# Altium PCB PCB_ARC_1.0.5.PcbDoc (part 1 of 4)
Units mil, origin at the board's own origin, x right, y up, seen from the top; angles counter-clockwise.
Board outline 3621 x 2945 mil, 2 copper layers (Top Layer, Bottom Layer), stack 62 mil thick; 201 components, 125 nets, 582 pads, 196 vias.
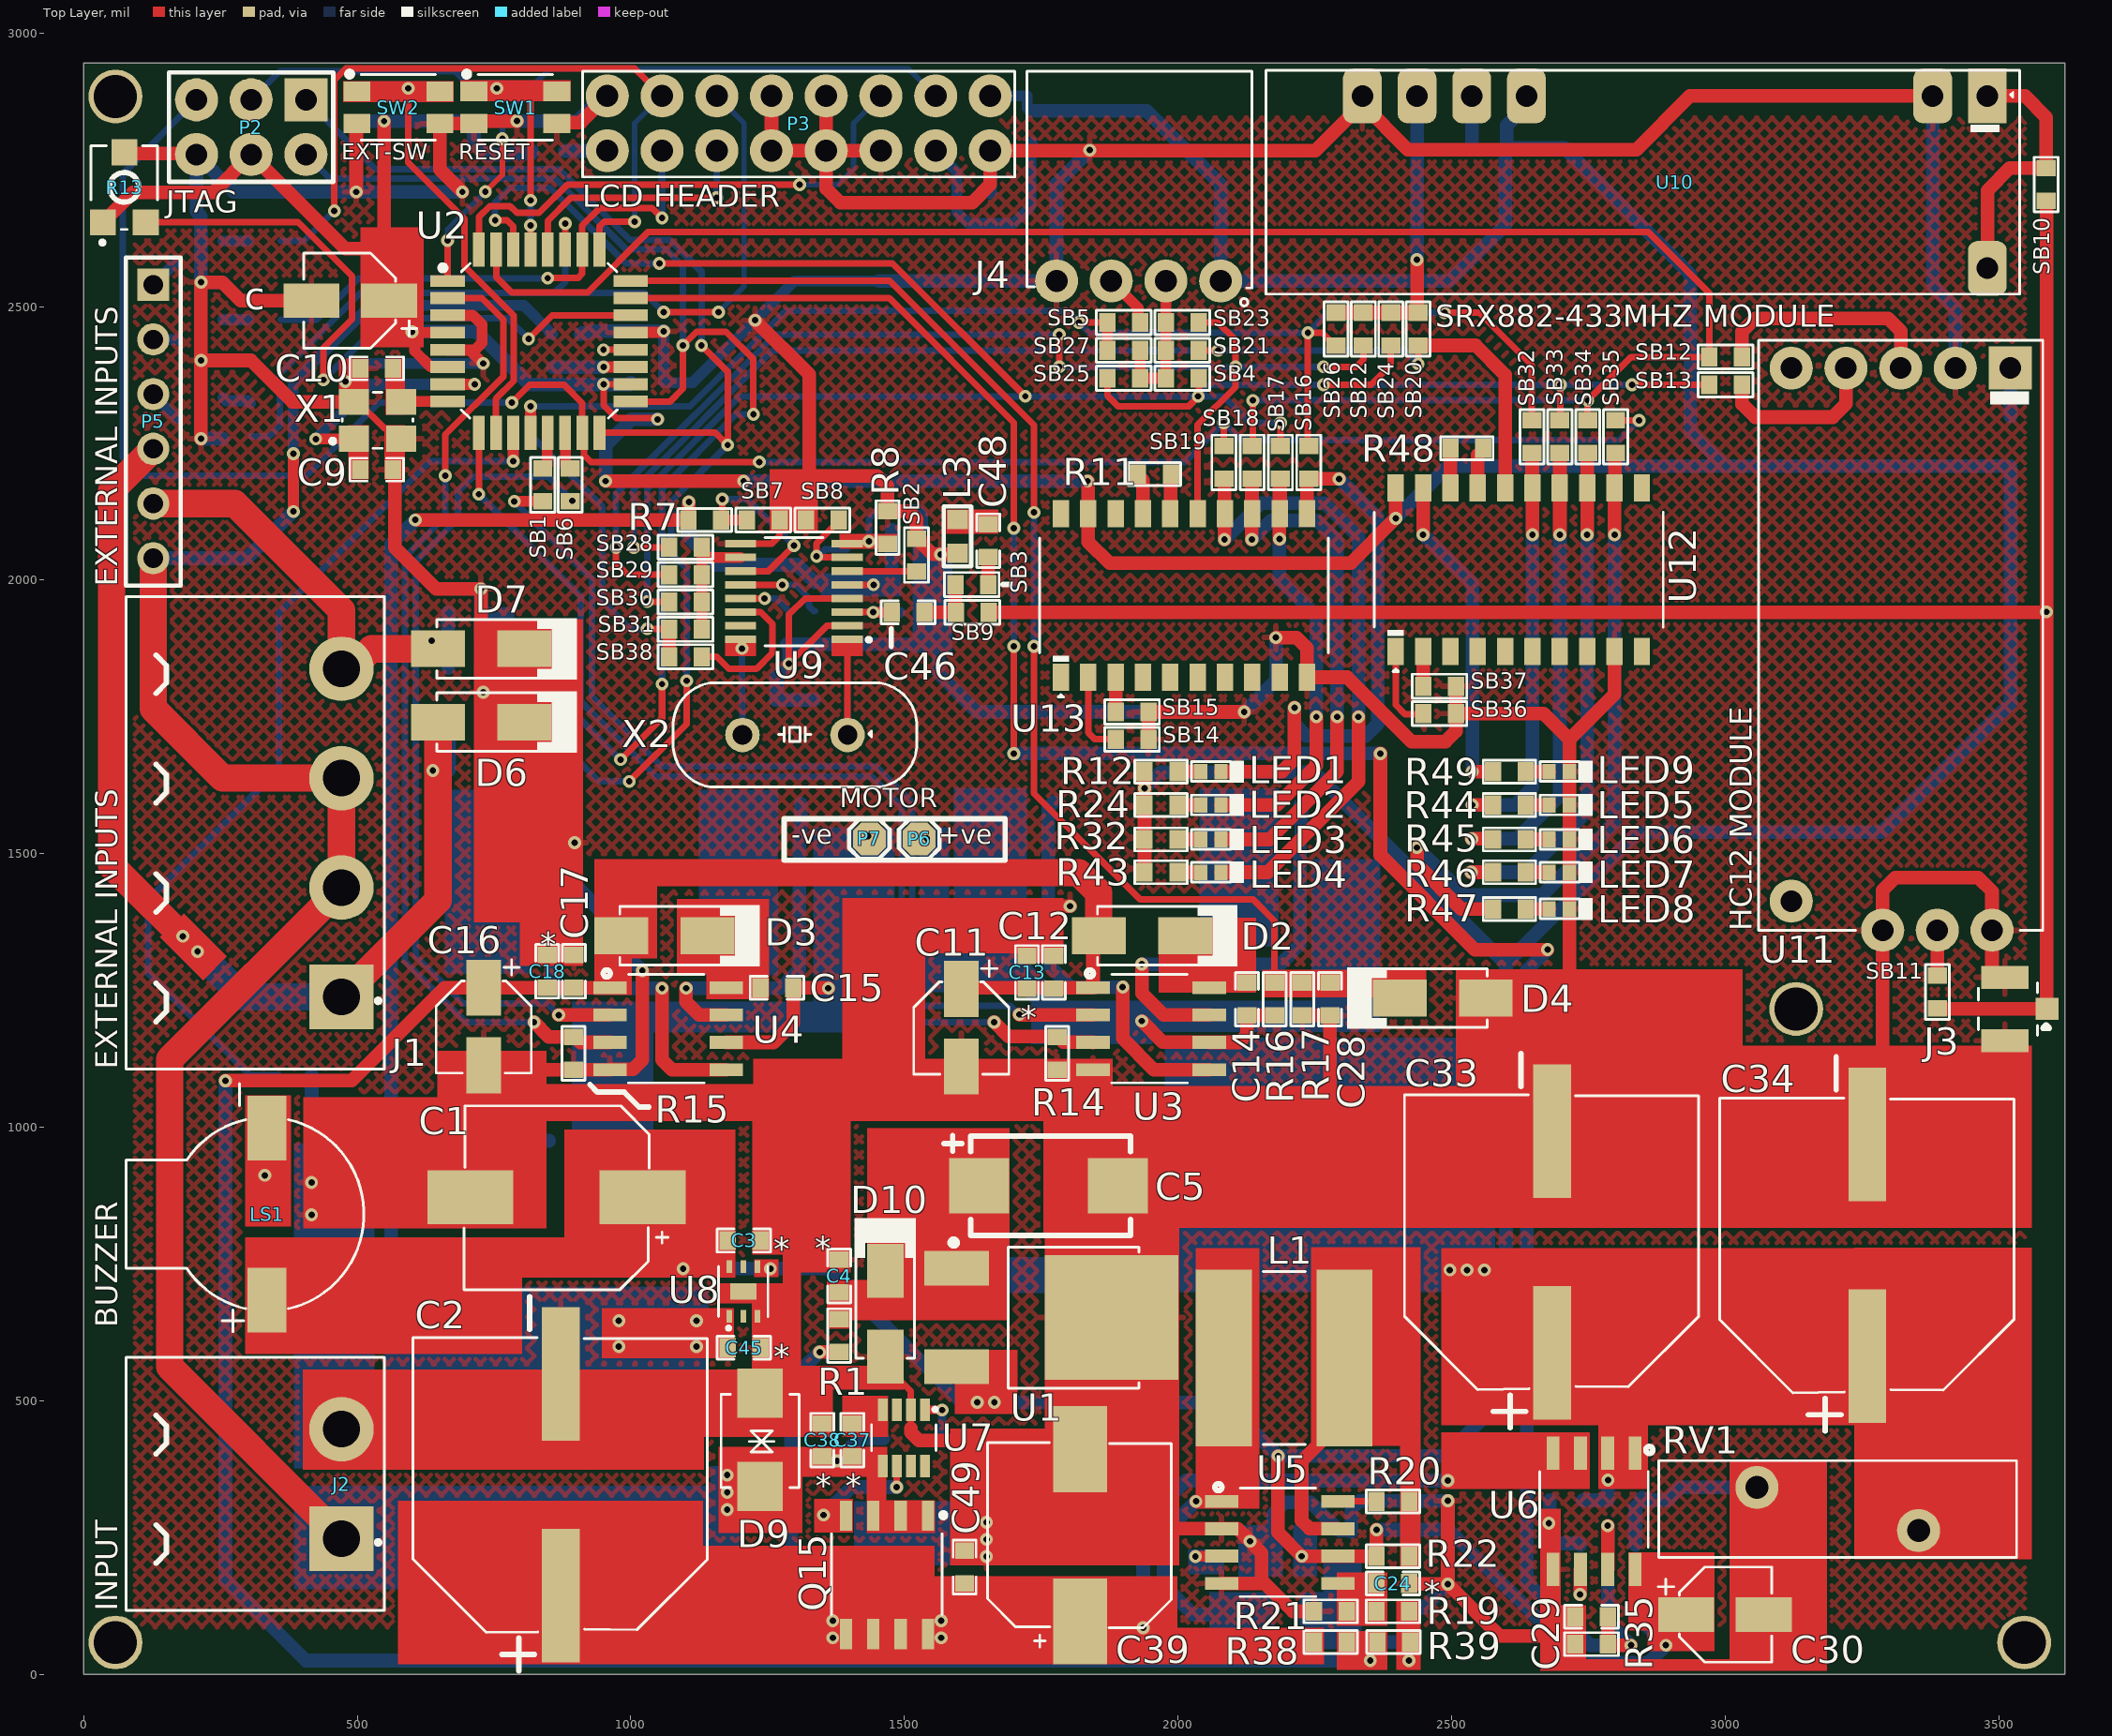
[diagram p0: Top Layer view]
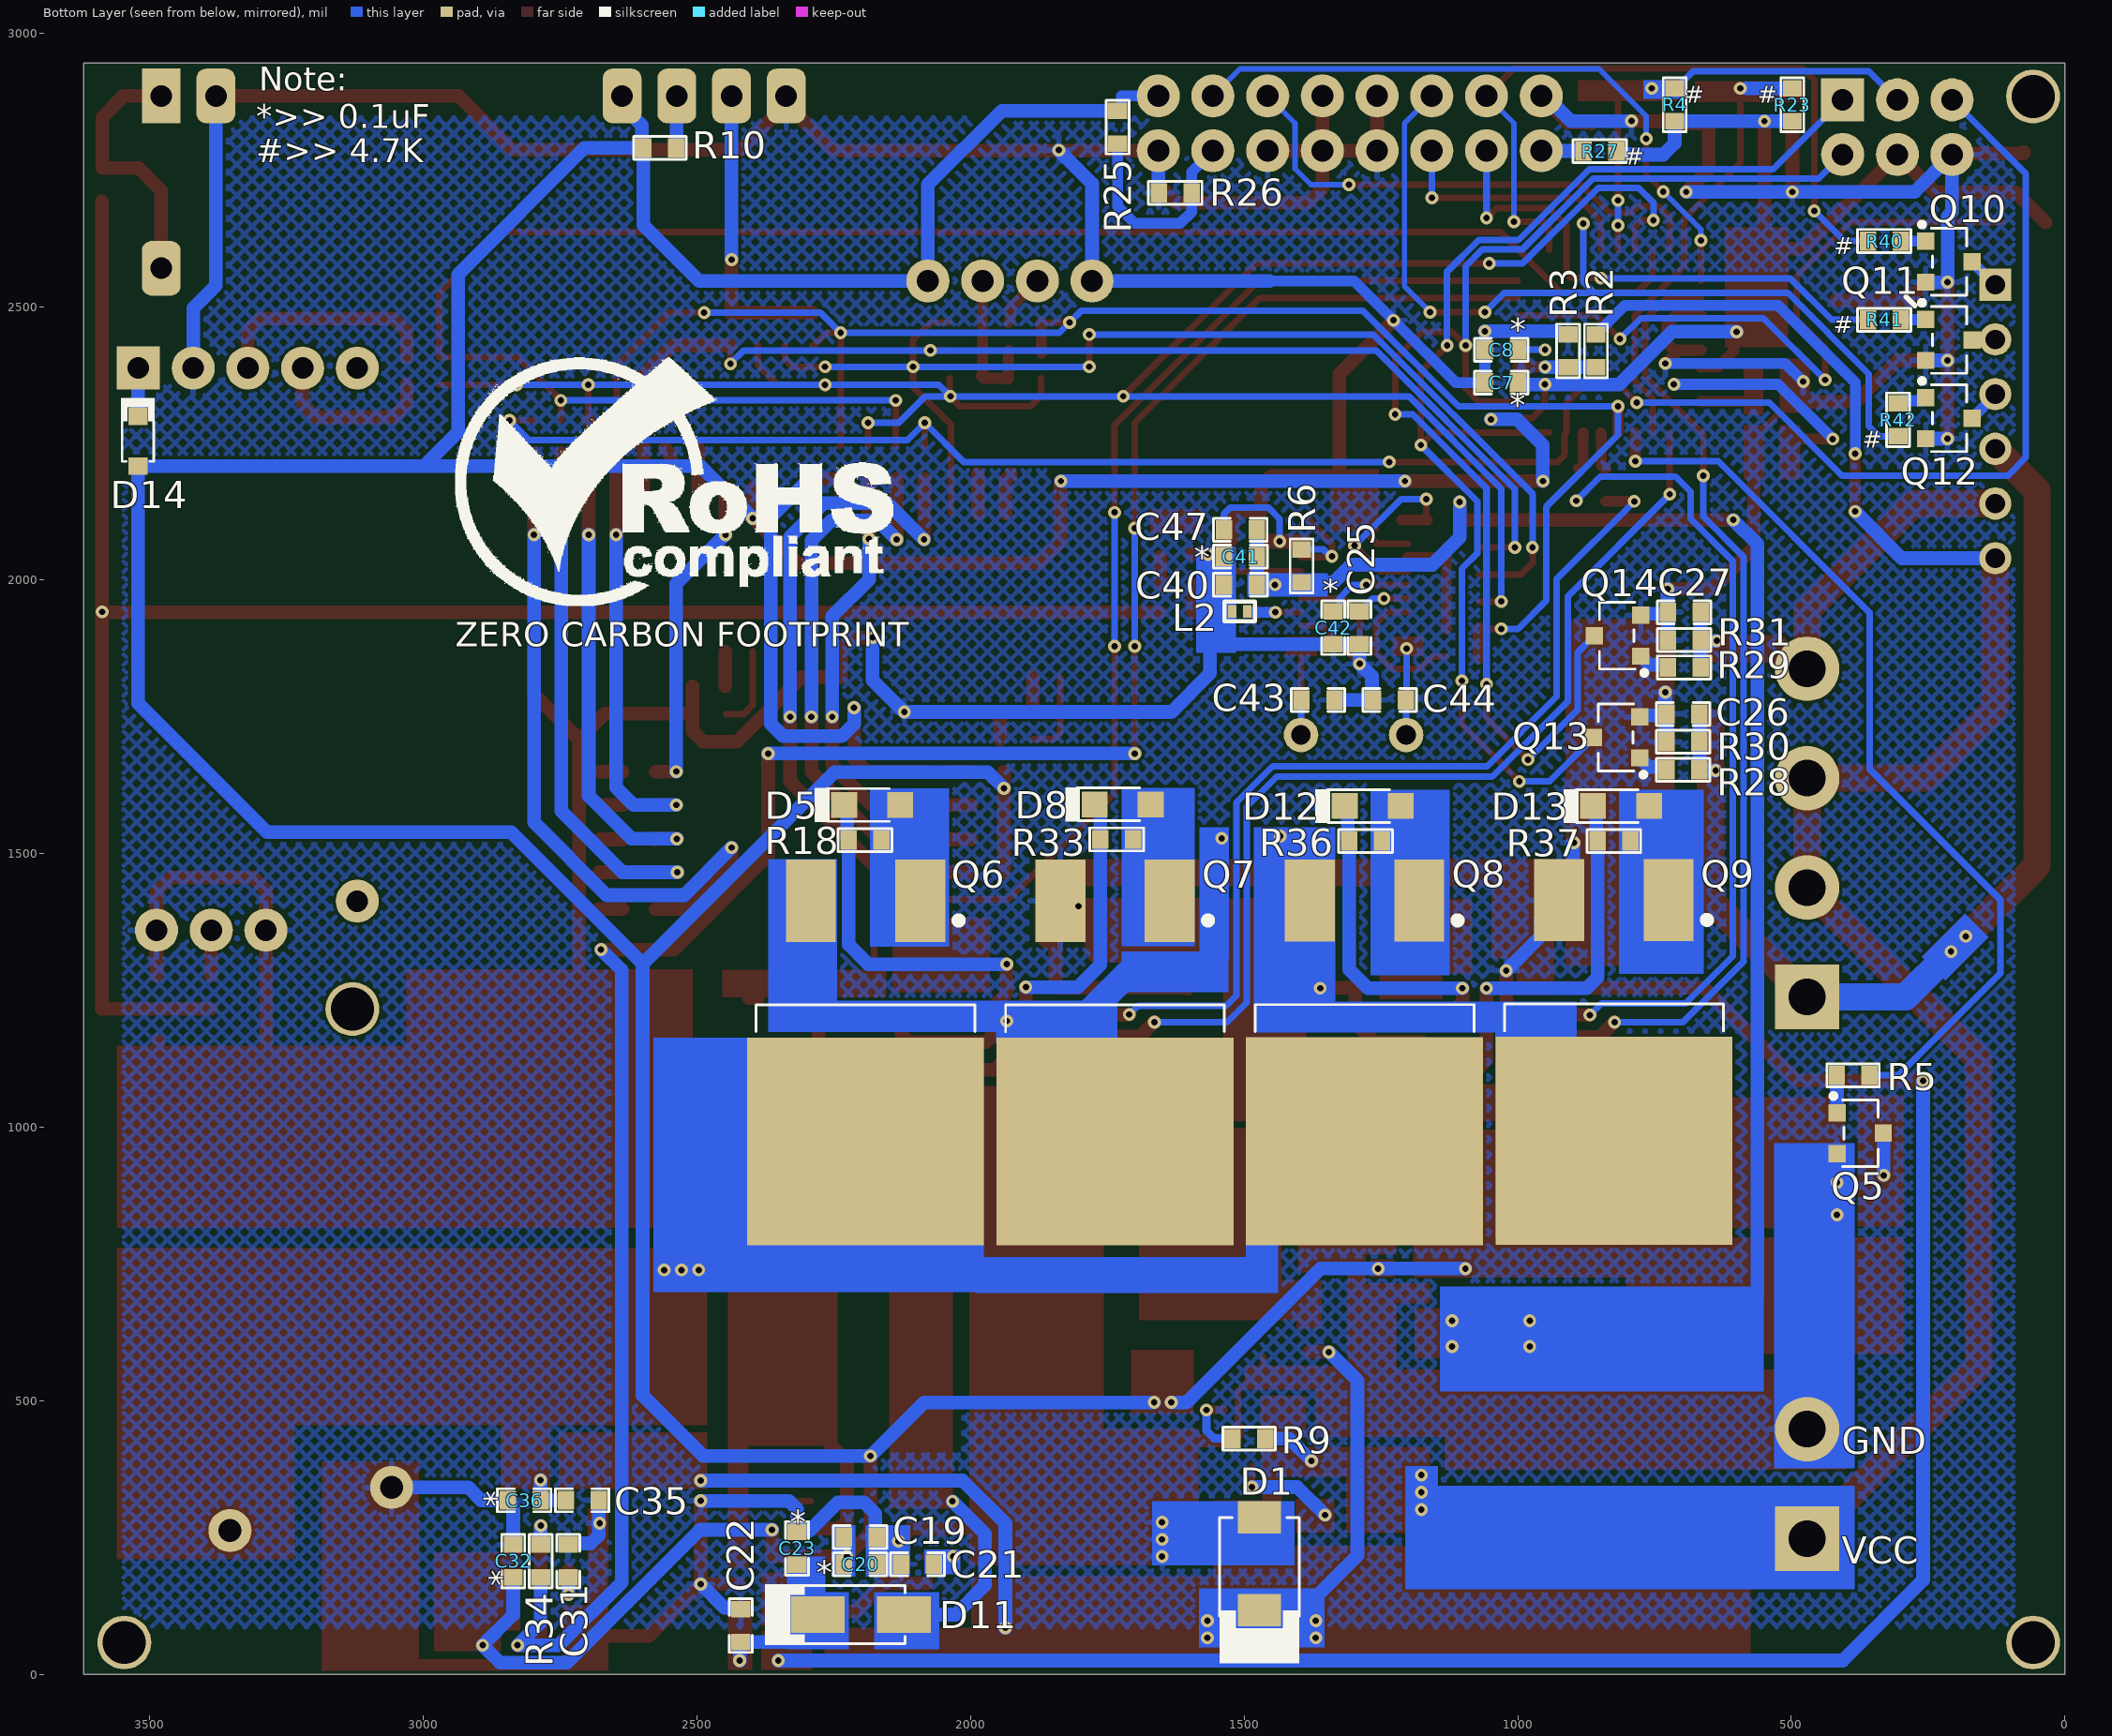
[diagram p1: Bottom Layer view, seen from below]
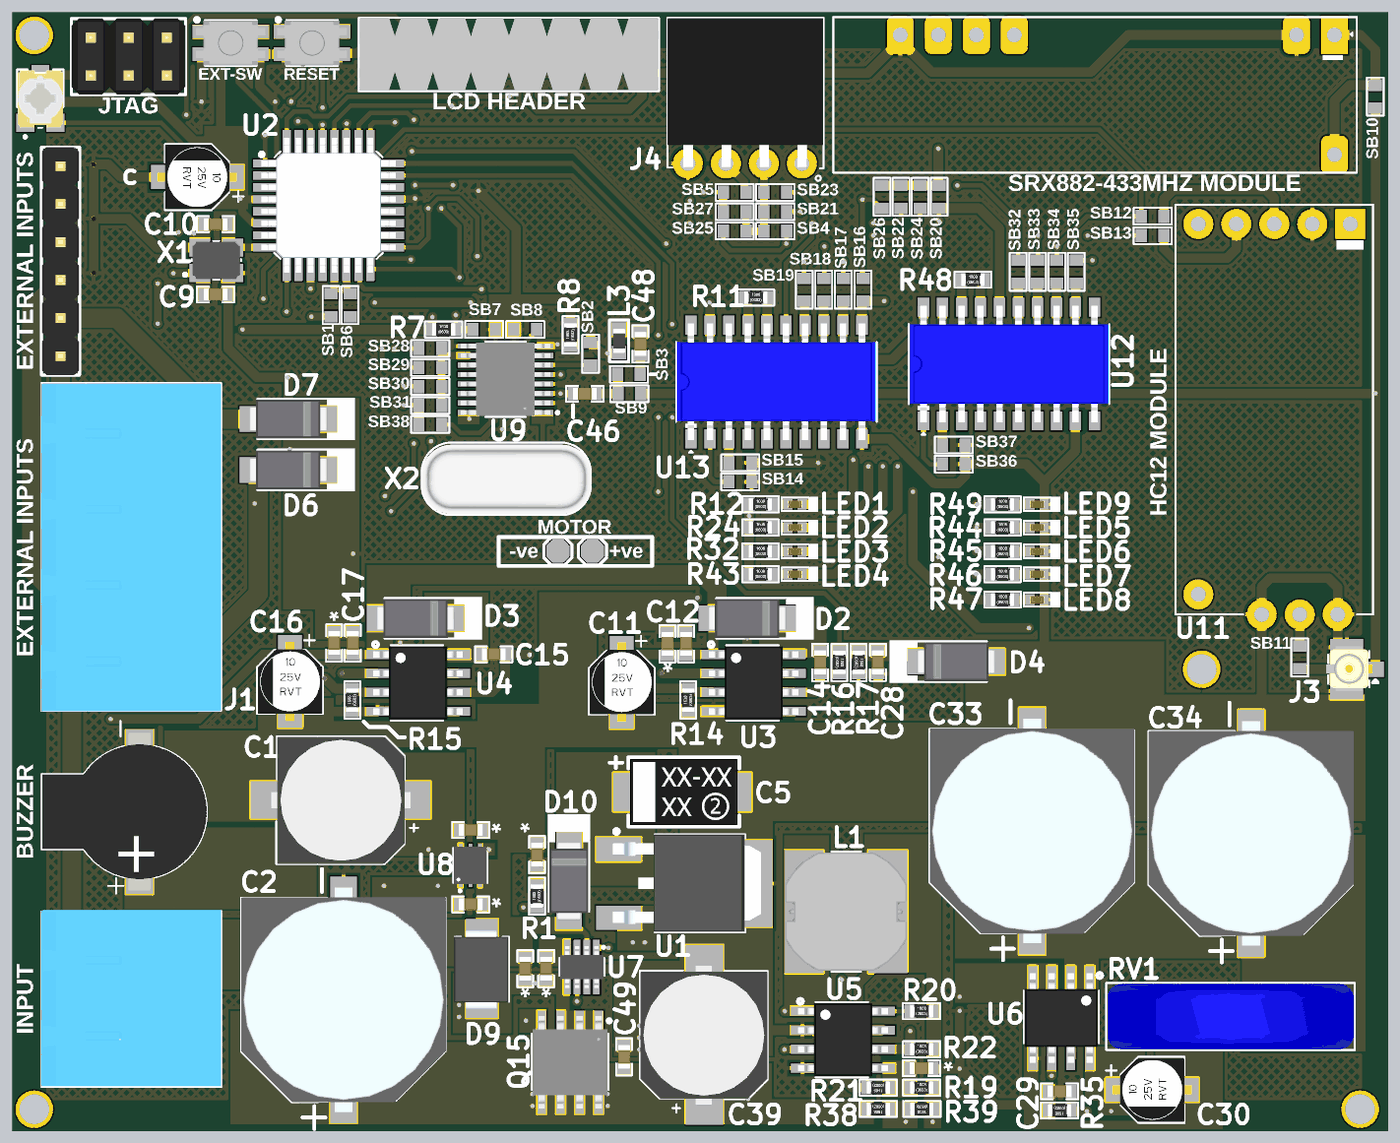
[diagram p3: 3D render of the assembled board from above, using the file's embedded part models]
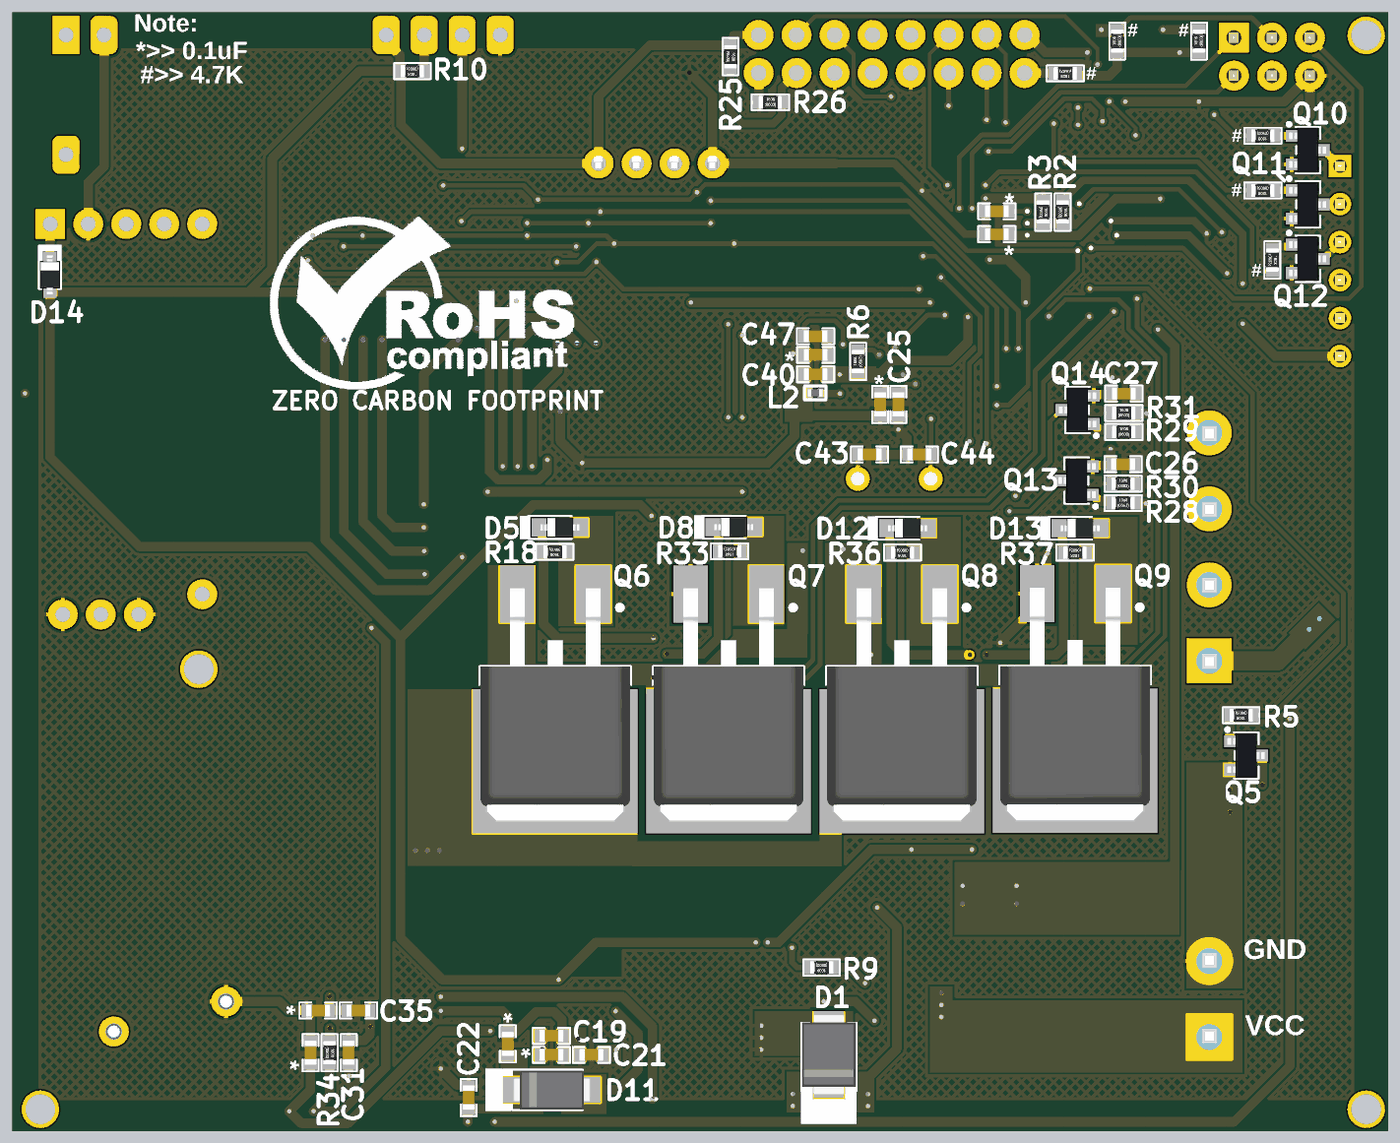
[diagram p4: 3D render of the assembled board from below, using the file's embedded part models]

## Layer stack, top to bottom
Top Solder: solder mask 0.5, Solder Resist, Dk 3.5
Top Layer: signal copper 12.5
Dielectric 1: dielectric 37, FR-4, Dk 4.8
Bottom Layer: signal copper 12.5
Bottom Solder: solder mask 0.5, Solder Resist, Dk 3.5

## Board outline
0,0 0,2945 3621,2945 3621,0

## Design rules (kind name [scope] priority, off if disabled: settings)
Clearance [All] p1: gap=5 ignorepadtopadclearanceinfootprint=FALSE except(4: Arc-SMDPad Track-SMDPad SMDPad-SMDPad)
ComponentClearance [All] p1: gap=0 collisioncheckmode=3 verticalgap=0 showdistances=FALSE
HoleSize [All] p1: absolutevalues=TRUE maxlimit=1000 minlimit=1 maxpercent=80.000 minpercent=20.000
HoleToHoleClearance [All] p1: gap=0 allowstackedmicrovias=TRUE
MinimumSolderMaskSliver [All] p1: minsoldermaskwidth=0
PolygonConnect [All] p1: connectstyle=Relief reliefconductorwidth=10 reliefentries=4 polygonreliefangle="90 Angle" airgapwidth=10
RoutingVias [All] p1: holewidth=11.81 width=23.62 viastyle="Through Hole" minholewidth=11.81 minwidth=23.62 maxholewidth=31.5 maxwidth=62.99
SilkToSilkClearance [All] p1: silktosilkclearance=0
SilkToSolderMaskClearance [IsPad] p1: minsilkscreentomaskgap=0 clearancetoexposedcopper=TRUE
SolderMaskExpansion [All] p1: expansion=4 istentingtop=FALSE
Width [All] p1: maxlimit=100 minlimit=8 preferedwidth=12
24 further rules are at their usual default settings.

## Classes and differential pairs
component class U_RF_Receiver_Section: C25 C40 C41 C42 C43 C44 C46 C47 C48 D14 J3 J4 L2 L3 LED1 LED2 LED3 LED4 LED5 LED6 LED7 LED8 LED9 R6 R7 R8 R10 R11 R12 R24 R32 R43 R44 R45 R46 R47 R48 R49 SB2 SB3 SB4 SB5 SB7 SB8 SB9 SB10 SB11 SB12 SB13 SB14 SB15 SB16 SB17 SB18 SB19 SB20 SB21 SB22 SB23 SB24 SB25 SB26 SB27 SB28 SB29 SB30 SB31 SB32 SB33 SB34 SB35 SB36 SB37 SB38 U9 U10 U11 U12 U13 X2
component class U_Power_Section: C1 C2 C3 C4 C5 C19 C20 C21 C22 C23 C24 C37 C38 C39 C45 C49 D1 D9 D10 D11 L1 Q15 R1 R9 R19 R20 R21 R22 R38 R39 U1 U5 U7 U8
component class U_Motor_Driver_Section: C11 C12 C13 C14 C15 C16 C17 C18 C28 D2 D3 D4 D5 D8 D12 D13 P6 P7 Q6 Q8 Q9 R14 R15 R16 R17 R18 R33 R36 R37 U3 U4
component class U_Current_Sense_Section: C29 C30 C31 C32 C33 C34 C35 C36 R34 R35 RV1 U6
component class U_Controller_Section: c C7 C8 C9 C10 P2 R2 R3 R4 R13 R23 SB1 SB6 SW1 SW2 U2 X1
component class U_Connector_Section: C26 C27 D6 D7 J1 J2 LS1 P3 P5 Q5 Q10 Q11 Q12 Q14 R5 R25 R26 R27 R28 R29 R30 R31 R40 R41 R42

## Components (designator, comment, footprint, x,y, rotation, side; value= is the part's Value field where it differs from the comment)
c "10uF" RVT1E100M0405. 487,2511 r180 top locked (schematic designator C6)
C1 "220uF" UCD1H221MNL1GS 864,872 r180 top locked
C2 "470uF" VT1H471MI135000CE0 872,346 r90 top locked
C3 "0.1uF" Cap0603 1206.59,792.72 r0 top locked
C4 "0.1uF" Cap0603 1381,728 r90 top locked
C5 "100uF" "CAP- 2917" 1636.46,893 r0 top locked
C7 "0.1uF" Cap0603 1030,2361 r0 bottom locked
C8 "0.1uF" Cap0603 1030,2421 r0 bottom locked
C9 "18pF" Cap0603 535.35,2202 r180 top locked
C10 "18pF" Cap0603 535.35,2387 r0 top locked
C11 "10uF" RVT1E100M0405. 1604,1182 r270 top locked
C12 "1uF" Cap0603 1773,1283 r90 top locked
C13 "0.1uF" Cap0603 1724,1283 r90 top locked
C14 "1uF" Cap0603 2126,1234 r90 top locked
C15 "1uF" Cap0603 1267,1255 r180 top locked
C16 "10uF" RVT1E100M0405. 731,1184 r270 top locked
C17 "1uF" Cap0603 896,1285 r90 top locked
C18 "0.1uF" Cap0603 847,1285 r90 top locked
C19 "10uF" Cap0603 2202,251 r180 bottom locked
C20 "0.1uF" Cap0603 2202,201 r180 bottom locked
C21 "1nF" Cap0603 2097,201 r180 bottom locked
C22 "10uF" Cap0603 2420,89 r90 bottom locked
C23 "0.1uF" Cap0603 2317,230 r90 bottom locked
C24 "0.1uF" Cap0603 2393,166 r0 top locked
C25 "0.47uF" Cap0603 1289,1913 r270 bottom locked
C26 "1uF" Cap0603 697.65,1755.41 r180 bottom locked
C27 "1uF" Cap0603 695.85,1941.39 r180 bottom locked
C28 "1uF" Cap0603 2278,1234 r270 top locked
C29 "1uF" Cap0603 2756,105 r180 top locked
C30 "10uF" RVT1E100M0405. 3000,109 r0 top locked
C31 "1uF" Cap0603 2735.56,206.7 r90 bottom locked
C32 "0.1uF" Cap0603 2836,206.7 r90 bottom locked
C33 "470uF" VT1H471MI135000CE0 2684,790 r90 top locked
C34 "470uF" VT1H471MI135000CE0 3260,784 r90 top locked
C35 "1uF" Cap0603 2710,318 r180 bottom locked
C36 "0.1uF" Cap0603 2816,318 r0 bottom locked
C37 "0.1uF" Cap0603 1405,428 r270 top locked
C38 "0.1uF" Cap0603 1350,428 r90 top locked
C39 "220uF" UCD1H221MNL1GS 1821,254 r90 top locked
C40 "0.47uF" Cap0603 1506.78,1992 r0 bottom locked
C41 "0.1uF" Cap0603 1506.78,2043 r0 bottom locked
C42 "0.1uF" Cap0603 1337,1913 r270 bottom locked
C43 "20pF" Cap-0603 1365,1781 r0 bottom locked
C44 "20pF" Cap-0603 1234,1781 r180 bottom locked
C45 "0.1uF" Cap0603 1206.59,597 r0 top locked
C46 "1.2pF" Cap0603 1506.78,1941 r0 top locked
C47 "2.2uF" Cap0603 1507,2092 r180 bottom locked
C48 "1.5pF" Cap0603 1653,2072 r270 top locked
C49 "2.2uF" Cap-0603 1610,196 r90 top locked
D1 "SS510" SMB 1472,202 r90 bottom locked
D2 "SS14-E3/61T" SMA 1934,1350 r180 top locked
D3 "SS14-E3/61T" SMA 1061,1350 r180 top locked
D4 "SMAJ5.0CA" SMA 2484,1236 r0 top locked
D5 "1N4148WS" SOD-323#1 2180,1589 r180 bottom locked
D6 "SMAJ5.0CA" SMA 726.32,1740.41 r180 top locked
D7 "SMAJ5.0CA" SMA 726.32,1874.41 r180 top locked
D8 "1N4148WS" SOD-323#1 1722,1590 r180 bottom locked
D9 "SMBJ33CA" SMBJ33CA 1236,343.53 r90 top locked
D10 "SZ4516" SMA 1465,659 r270 top locked
D11 "SS14-E3/61T" SMA 2201,109 r180 bottom locked
D12 "1N4148WS" SOD-323#1 1265,1587 r180 bottom locked
D13 "1N4148WS" SOD-323#1 811,1587 r180 bottom locked
D14 "1N4148WS-7-F" SOD-323#2 3522,2254 r270 bottom locked
J1 "TBP01R1-508-04BE" TBP01R1-508-04BE 471,1438 r90 top locked
J2 "TBP01R1-508-02BE" TBP01R1-508-02BE 471,348 r90 top locked
J3 "U.FL-R-SMT-1(80)" U.FL-R-SMT-1(80)_ 3550,1216 r90 top locked
J4 "XY-MK-5V Module" DW254W-11-04-85 2078,2547 r180 top locked
L1 "100uH" SRN8040-101M 2194,578 r0 top locked
L2 "39nH" "IND 0402" 1508,1943 r0 bottom locked
L3 "33nH" "IND 0603" 1597,2080 r270 top locked
LED1 "Yellow" LED-0402 2060,1650 r0 top locked
LED2 "Yellow" LED-0402 2060,1589 r0 top locked
LED3 "Yellow" LED-0402 2060,1526 r0 top locked
LED4 "Yellow" LED-0402 2060,1466 r0 top locked
LED5 "Yellow" LED-0402 2697,1589 r0 top locked
LED6 "Yellow" LED-0402 2697,1526 r0 top locked
LED7 "Yellow" LED-0402 2697,1466 r0 top locked
LED8 "Yellow" LED-0402 2697,1399 r0 top locked
LED9 "Blue" LED-0402 2697,1650 r0 top locked
LS1 "YS-SBZ9032C03R16" YS-SBZ9032C03R16 335,841 r90 top locked
P2 "M20-9980346" HDR2X3 406,2878 r180 top locked
P3 "B-2100S08P-B110" B-2100S08P-B110 1307,2835 r180 top locked
P5 "61300611121" HDR1X6 127,2540 r270 top locked
P6 "Test Point" "TEST POINT" 1527,1527 r270 top locked
P7 "Test Point" "TEST POINT" 1436,1527 r270 top
Q5 "MMBT5551" SOT23-3 374,989 r270 bottom locked
Q6 "IRF3205STRLPBF" D2PAK 2192,1193.88 r0 bottom locked
Q7 "IRF3205STRLPBF" D2PAK 1736,1193.88 r0 bottom locked
Q8 "IRF3205STRLPBF" D2PAK 1280,1194 r0 bottom locked
Q9 "IRF3205STRLPBF" D2PAK 824,1195 r0 bottom locked
Q10 "MMBT5551" SOT23-3 212,2582 r270 bottom locked
Q11 "MMBT5551" SOT23-3 212,2439 r270 bottom locked
Q12 "MMBT5551" SOT23-3 212,2296 r270 bottom locked
Q13 "MMBT5551" SOT23-3 819.32,1712.41 r90 bottom locked
Q14 "MMBT5551" SOT23-3 817.53,1898.39 r90 bottom locked
Q15 "RU6085H" RU6085H 1468,181.73 r270 top locked
R1 "33R" Res0603 1381,619 r270 top locked
R2 "6.8K" Res0603 857,2419 r90 bottom locked
R3 "3.3K" Res0603 908,2419 r90 bottom locked
R4 "4.7K" Res0603 713,2869 r270 bottom locked
R5 "4.7K" Res-0603 387,1095 r180 bottom locked
R6 "10K" Res0603 1395,2026 r270 bottom locked
R7 "10K" Res0603 1135,2110 r180 top locked
R8 "100K" Res0603 1469,2096 r270 top locked
R9 "1.2K" Res-0603 1491,431 r180 bottom locked
R10 "1K" Res-0603 2568,2790 r180 bottom locked
R11 "68K" Res-0603 1957,2194 r180 top locked
R12 "330R" Res-0603 1969,1650 r180 top locked
R13 "2.2K" VG039NCHXTB222 74,2718 r0 top locked
R14 "2.2K" Res0603 1779,1135 r270 top locked
R15 "2.2K" Res0603 895,1135 r270 top locked
R16 "5.6K" Res0603 2176.67,1234 r90 top locked
R17 "3.3K" Res0603 2227.33,1234 r90 top locked
R18 "47R" Res0603 2193.1,1525 r180 bottom locked
R19 "10K" Res0603 2393,115 r180 top locked
R20 "180R" Res0603 2393,316 r180 top locked
R21 "1K" Res0603 2279,115 r0 top locked
R22 "0.33R" Res0603 2393,216 r180 top locked value=0.33Ω
R23 "4.7K" Res0603 498,2869 r270 bottom locked
R24 "330R" Res-0603 1969,1589 r180 top locked
R25 "4.7K" Res0603 1731,2828 r90 bottom locked
R26 "4.7K" Res0603 1626,2708 r0 bottom locked
R27 "4.7K" Res0603 850,2784 r180 bottom locked
R28 "10K" Res0603 697.65,1653.41 r0 bottom locked
R29 "10K" Res0603 695.85,1840.39 r0 bottom locked
R30 "10K" Res0603 697.65,1704.41 r0 bottom locked
R31 "10K" Res0603 695.85,1890.39 r0 bottom locked
R32 "330R" Res-0603 1969,1526 r180 top locked
R33 "47R" Res0603 1733,1526 r180 bottom locked
R34 "2.2K" Res0603 2785.78,206.7 r90 bottom locked
R35 "470K" Res0603 2756,55 r0 top locked
R36 "47R" Res0603 1278.11,1523 r180 bottom locked
R37 "47R" Res0603 824.12,1523 r180 bottom locked
R38 "0R" Res0603 2279,59 r0 top locked
R39 "0R" Res0603 2394,59 r0 top locked
R40 "4.7K" Res0603 330,2620 r180 bottom locked
R41 "4.7K" Res0603 330,2476 r180 bottom locked
R42 "4.7K" Res0603 305,2293 r90 bottom locked
R43 "330R" Res-0603 1969,1466 r180 top locked
R44 "330R" Res-0603 2606,1589 r180 top locked
R45 "330R" Res-0603 2606,1526 r180 top locked
R46 "330R" Res-0603 2606,1466 r180 top locked
R47 "330R" Res-0603 2606,1399 r180 top locked
R48 "820K" Res-0603 2528,2241 r180 top locked
R49 "220R" Res-0603 2606,1650 r180 top locked
RV1 "14D330K" 14D330K 3206,302 r180 top locked
SB1 "Solder Bridge" "Solder Bridge" 839,2174 r90 top locked
SB2 "Solder Bridge" "Solder Bridge" 1522,2046 r90 top locked
SB3 "Solder Bridge" "Solder Bridge" 1623,1992 r180 top locked
SB4 "Solder Bridge" "Solder Bridge" 2008,2369 r180 top locked
SB5 "Solder Bridge" "Solder Bridge" 1901,2471 r0 top locked
SB6 "Solder Bridge" "Solder Bridge" 889,2174 r90 top locked
SB7 "Solder Bridge" "Solder Bridge" 1242,2110 r0 top locked
SB8 "Solder Bridge" "Solder Bridge" 1350,2110 r180 top locked
SB9 "Solder Bridge" "Solder Bridge" 1624,1941 r0 top locked
SB10 "Solder Bridge" "Solder Bridge" 3587,2723 r270 top locked
SB11 "Solder Bridge" "Solder Bridge" 3388,1247 r270 top locked
SB12 "Solder Bridge" "Solder Bridge" 3001,2408 r180 top locked
SB13 "Solder Bridge" "Solder Bridge" 3001,2357 r180 top locked
SB14 "Solder Bridge" "Solder Bridge" 1916,1709 r180 top locked
SB15 "Solder Bridge" "Solder Bridge" 1916,1759 r180 top locked
SB16 "Solder Bridge" "Solder Bridge" 2239,2215 r90 top locked
SB17 "Solder Bridge" "Solder Bridge" 2187.33,2215 r90 top locked
SB18 "Solder Bridge" "Solder Bridge" 2135.67,2215 r90 top locked
SB19 "Solder Bridge" "Solder Bridge" 2084,2215 r90 top locked
SB20 "Solder Bridge" "Solder Bridge" 2439,2459 r270 top locked
SB21 "Solder Bridge" "Solder Bridge" 2008,2420 r0 top locked
SB22 "Solder Bridge" "Solder Bridge" 2339,2459 r270 top locked
SB23 "Solder Bridge" "Solder Bridge" 2008,2471 r0 top locked
SB24 "Solder Bridge" "Solder Bridge" 2389,2459 r270 top locked
SB25 "Solder Bridge" "Solder Bridge" 1901,2369 r180 top locked
SB26 "Solder Bridge" "Solder Bridge" 2289,2459 r270 top locked
SB27 "Solder Bridge" "Solder Bridge" 1901,2420 r180 top locked
SB28 "Solder Bridge" "Solder Bridge" 1100,2060 r180 top locked
SB29 "Solder Bridge" "Solder Bridge" 1100,2010 r180 top locked
SB30 "Solder Bridge" "Solder Bridge" 1100,1960 r180 top locked
SB31 "Solder Bridge" "Solder Bridge" 1100,1910 r180 top locked
SB32 "Solder Bridge" "Solder Bridge" 2647,2262 r90 top locked
SB33 "Solder Bridge" "Solder Bridge" 2698,2262 r90 top locked
SB34 "Solder Bridge" "Solder Bridge" 2749,2262 r90 top locked
SB35 "Solder Bridge" "Solder Bridge" 2800,2262 r90 top locked
SB36 "Solder Bridge" "Solder Bridge" 2478,1756 r180 top locked
SB37 "Solder Bridge" "Solder Bridge" 2478,1806 r180 top locked
SB38 "Solder Bridge" "Solder Bridge" 1100,1860 r180 top locked
SW1 "TS-1185EC-C-D-B" TS-1185EC-C-D-B 789,2864 r0 top locked
SW2 "TS-1185EC-C-D-B" TS-1185EC-C-D-B 575,2864 r0 top locked
U1 "MC78M05ACDT" DPAK 1737,652 r270 top locked
U2 "ATMEGA168A-AU" 32-TQFP 832.32,2436.76 r0 top locked
U3 "IR2104S" SOIC-8 1951,1180 r0 top locked
U4 "IR2104S" SOIC-8 1068,1180 r0 top locked
U5 "MC34063ADR2G" SOIC-8 2186,241 r0 top locked
U6 "ACS712ELCTR-20A-T" SOIC-8 2760.56,298 r270 top locked
U7 "LM74500QDDFRQ1" TSOT-23-8 1499,432 r270 top locked
U8 "LP5900SD-3.3/NOPB" WSON-6 1205.59,699.72 r90 top locked
U9 "MICRF220AYQS" 16-QSOP 1298,1979 r180 top locked
U10 "SRX882-433MHZ" SRX882-433MHZ 3538.57,2932.24 r180 top locked
U11 "HC-12 Module" "HC-12 Module" 3580.91,2438.74 r270 top locked
U12 "PT2272-L4S" "SOP-20 (300 Mil)" 2623,2019 r90 top locked
U13 "HT12D-20SOPLF" "SOP-20 (300 Mil)" 2011,1972 r90 top locked
X1 "12MHz" X322512MOB4SI 537,2292 r0 top locked
X2 "13.52313MHz" HC-49S-2P 1300,1717 r180 top locked

## Footprints (in the part's own frame and the unit in brackets; to place one, negate y for a bottom-side part, rotate by r counter-clockwise, add the part's x,y. Pads: shape width x height; smd on the part's side, far side on the other; paste and mask are expansions set on the pad)
14D330K [mm]
  round 2 hole 1.06: 1(-3.75,1) 2(3.75,-1)
  silkscreen extent -8.31,-2.25 8.31,2.25, body extent -8.25,-2.2 8.25,2.2, height 20
16-QSOP [mm]
  rect 1.45x0.35 smd: 1(-2.475,2.222) 2(-2.475,1.587) 3(-2.475,0.952) 4(-2.475,0.317) 5(-2.475,-0.318) 6(-2.475,-0.953) 7(-2.475,-1.588) 8(-2.475,-2.223) 9(2.475,-2.222) 10(2.475,-1.587) 11(2.475,-0.952) 12(2.475,-0.317) 13(2.475,0.318) 14(2.475,0.953) 15(2.475,1.588) 16(2.475,2.223)
  silkscreen extent -3.54,-2.51 1.35,2.51, body extent -3,-2.45 3,2.45, height 1.76
32-TQFP [mm]
  rect 1.6x0.55 smd: 1(-4.25,2.8) 2(-4.25,2) 3(-4.25,1.2) 4(-4.25,0.4) 5(-4.25,-0.4) 6(-4.25,-1.2) 7(-4.25,-2) 8(-4.25,-2.8) 17(4.25,-2.8) 18(4.25,-2) 19(4.25,-1.2) 20(4.25,-0.4) 21(4.25,0.4) 22(4.25,1.2) 23(4.25,2) 24(4.25,2.8)
  rect 0.55x1.6 smd: 9(-2.8,-4.25) 10(-2,-4.25) 11(-1.2,-4.25) 12(-0.4,-4.25) 13(0.4,-4.25) 14(1.2,-4.25) 15(2,-4.25) 16(2.8,-4.25) 25(2.8,4.25) 26(2,4.25) 27(1.2,4.25) 28(0.4,4.25) 29(-0.4,4.25) 30(-1.2,4.25) 31(-2,4.25) 32(-2.8,4.25)
  silkscreen extent -4.6,-3.57 3.62,3.61, body extent -4.5,-4.5 4.5,4.5, height 1.18
B-2100S08P-B110 [mm] "Straight 2.54mm 6mm -40?~+105? 2 3mm 8 2.54mm Black Brass 2x4P 2.54mm Plugin,P=2.54mm Pin Headers"
  round 2 hole 1.02: 1(-8.89,1.27) 2(-8.89,-1.27) 3(-6.35,1.27) 4(-6.35,-1.27) 5(-3.81,1.27) 6(-3.81,-1.27) 7(-1.27,1.27) 8(-1.27,-1.27) 9(1.27,1.27) 10(1.27,-1.27) 11(3.81,1.27) 12(3.81,-1.27) 13(6.35,1.27) 14(6.35,-1.27) 15(8.89,1.27) 16(8.89,-1.27)
  silkscreen extent -10.03,-2.41 10.03,2.49, body extent -9.96,-2.44 9.96,2.44, height 7.84
Cap0603 [mil]
  rect 30x35 smd mask+2.36: 1(-30,0) 2(30,0)
  silkscreen extent -49,-21 49,21, body extent -32,-16 31,16, height 34
Cap-0603 [mil]
  rect 30x35 smd mask+2.36: 1(-30,0) 2(30,0)
  silkscreen extent -49,-21 49,21, body extent -32,-16 31,16, height 34
"CAP- 2917" [mm]
  rect 2.79x2.57 smd: 1(0,0) 2(6.44,0)
  silkscreen extent -1.63,-2.31 7.03,2.34, body extent -0.27,-2.21 6.92,2.21, height 2.88
D2PAK [mm]
  rect 2.32x3.81 smd: 1(-2.54,-5.585) 3(2.54,-5.585)
  rect 11x9.65 smd: 2(0,5.585)
  silkscreen extent -5.08,-4.75 5.08,0.48, body extent -5,-5.97 5,9.66, height 5.08
DPAK [mm]
  rect 1.6x3 smd: 1(-2.285,-3.59) 3(2.285,-3.59)
  rect 5.8x6.2 smd: 2(0,3.59)
  silkscreen extent -3.52,-3.77 3.28,4.88, body extent -3.28,-3.99 3.22,5.92, height 2.51
DW254W-11-04-85 [mm] "2.54mm 3A Shrouded 1x4P side 8.5mm 4 1 Square Holes Plugin,P=2.54mm Female Headers ROHS"
  round 2 hole 1.02: 1(0,0) 2(2.54,0) 3(5.08,0) 4(7.62,0)
  silkscreen extent -1.45,-9.73 8.99,1.16, body extent -1.42,-9.72 8.99,0.34, height 2.8
"HC-12 Module" [mm]
  rect 2x2 hole 1: 1(1.3,-1.52)
  round 2 hole 1: 2(1.3,-4.06) 3(1.3,-6.6) 4(1.3,-9.14) 5(1.3,-11.68) 6(27.4,-4.9) 7(27.4,-2.36) 8(27.4,-7.44) 9(26.05,-11.68)
  silkscreen extent 0,-13.2 27.4,0
HC-49S-2P [mm]
  round 1.6 hole 0.9: 1(-2.44,0) 2(2.44,0)
  silkscreen extent -5.66,-2.41 5.66,2.41, body extent -5.7,-2.29 5.65,2.36, height 3.7
HDR1X6 [mm] "Connector; Header; 6 Position"
  rect 1.5x1.5 hole 0.9: 1(0,0)
  round 1.5 hole 0.9: 2(2.54,0) 3(5.08,0) 4(7.62,0) 5(10.16,0) 6(12.7,0)
  silkscreen extent -1.27,-1.27 13.97,1.27, body extent -1.27,-1.24 13.97,1.25, height 8.54
HDR2X3 [mm] "Connector; Header; 3x2 Position"
  rect 2x2 hole 1: 1(0,0)
  round 2 hole 1: 2(0,2.54) 3(2.54,0) 4(2.54,2.54) 5(5.08,0) 6(5.08,2.54)
  silkscreen extent -1.27,-1.27 6.35,3.81, body extent -1.27,-1.3 6.35,3.78, height 9.2
"IND 0402" [mm]
  rect 0.4x0.6 smd: 1(-0.35,0) 2(0.35,0)
  silkscreen extent -0.71,-0.46 0.71,0.46, body extent -0.5,-0.25 0.5,0.25, height 0.25
"IND 0603" [mm]
  rect 0.9x0.97 smd: 1(-0.785,0) 2(0.785,0)
  silkscreen extent -1.4,-0.64 1.4,0.64, body extent -0.8,-0.4 0.8,0.4, height 0.78
LED-0402 [mm]
  rect 0.62x0.72 smd: 1(-0.475,0) 2(0.475,0)
  silkscreen extent -0.89,-0.51 1.55,0.51, body extent -0.5,-0.25 0.51,0.25, height 0.45
Res0603 [mil]
  rect 30x35 smd: 1(-30,0) 2(30,0)
  silkscreen extent -49,-21 49,21, body extent -31,-17 31,17, height 18
Res-0603 [mil]
  rect 30x35 smd: 1(-30,0) 2(30,0)
  silkscreen extent -48,-21 48,21, body extent -31,-17 31,17, height 18
RU6085H [mm]
  rect 1.4x0.57 smd: 1(-2.75,1.905) 2(-2.75,0.635) 3(-2.75,-0.635) 4(-2.75,-1.905) 5(2.75,-1.905) 6(2.75,-0.635) 7(2.75,0.635) 8(2.75,1.905)
  silkscreen extent -2.88,-2.57 1.85,2.72, body extent -3.1,-2.5 3.1,2.5, height 1.5
RVT1E100M0405. [mm] "10uF 25V 5.4mm SMD"
  rect 2.6x1.6 smd: 1(-1.8,0) 2(1.8,0)
  silkscreen extent -3.1,-2.21 2.16,2.21, body extent -2.65,-2.15 2.65,2.15, height 3.95
SMA [mm]
  rect 2.5x1.7 smd: 1(-2,0) 2(2,0)
  silkscreen extent -4.45,-1.42 2.06,1.42, body extent -2.6,-1.3 2.6,1.3, height 2.4
SMB [mm]
  rect 1.5x2 smd: 1(-2.15,0) 2(2.15,0)
  silkscreen extent -4.64,-1.85 2.13,1.85, body extent -2.7,-1.8 2.7,1.8, height 2.3
SMBJ33CA [mm] "11.3A 53.3V 36.7V 33V Bi-Directional SMB(DO-214AA) TVS ROHS"
  rect 2.28x2.12 smd: 1(0,0) 2(4.33,0)
  silkscreen extent -0.05,-1.82 4.27,1.8, body extent -0.59,-1.76 4.75,1.86, height 2.65
SOD-323#1 [mm]
  rect 1.2x1.2 smd: 1(-1.3,0) 2(1.3,0)
  silkscreen extent -2.67,-0.79 0.79,0.79, body extent -1.3,-0.67 1.3,0.67, height 1.1
SOD-323#2 [mm]
  rect 0.8x0.9 smd mask+0.055: 1(-1.15,0) 2(1.15,0)
  silkscreen extent -2.01,-0.79 0.94,0.79, body extent -1.3,-0.67 1.3,0.67, height 1.1
SOIC-8 [mm]
  rect 1.55x0.6 smd: 1(-2.7,1.905) 2(-2.7,0.635) 3(-2.7,-0.635) 4(-2.7,-1.905) 5(2.7,-1.905) 6(2.7,-0.635) 7(2.7,0.635) 8(2.7,1.905)
  silkscreen extent -3.01,-2.51 1.68,2.73, body extent -3,-2.45 3,2.45, height 1.7
"Solder Bridge" [mil] "Solder Bridge ON"
  rect 30x35 smd: 1(-30,0) 2(30,0)
  silkscreen extent -50,-22 50,22
"SOP-20 (300 Mil)" [mm]
  rect 1.27x0.76 smd: 1(-3.8,5.715) 2(-3.8,4.445) 3(-3.8,3.175) 4(-3.8,1.905) 5(-3.8,0.635) 6(-3.8,-0.635) 7(-3.8,-1.905) 8(-3.8,-3.175) 9(-3.8,-4.445) 10(-3.8,-5.715) 11(3.8,-5.715) 12(3.8,-4.445) 13(3.8,-3.175) 14(3.8,-1.905) 15(3.8,-0.635) 16(3.8,0.635) 17(3.8,1.905) 18(3.8,3.175) 19(3.8,4.445) 20(3.8,5.715)
  silkscreen extent -4.72,-6.71 2.67,6.71, body extent -3.9,-6.65 3.9,6.65, height 1.6
SOT23-3 [mm] "SOT23, 3-Leads, Body 2.9x1.3mm, Pitch 0.95mm, Lead Span 2.3mm - Reverse Pinning, IPC High Density"
  rect 0.8x0.8 smd: 1(-0.95,-1.075) 2(0.95,-1.075) 3(0,1.075)
  silkscreen extent -1.83,-1.35 1.55,0.84, body extent -1.5,-1.25 1.5,1.25, height 1.08
SRN8040-101M [mm]
  rect 2.6x8.2 smd: 1(-2.8,0) 2(2.8,0)
  silkscreen extent -0.97,-4.01 0.99,4.01, body extent -4.08,-3.95 4.08,3.95, height 3.95
SRX882-433MHZ [mm]
  rect 1.8x2.54 hole 1: 1(1.5,1.2)
  rrect50% 1.8x2.54 hole 1: 2(4.04,1.2) 3(22.9,1.2) 4(25.44,1.2) 5(27.98,1.2) 6(30.52,1.2) 7(1.5,9.2)
  silkscreen extent 0,0 35,10.4
TBP01R1-508-02BE [mm]
  rect 3x3 hole 1.7: 1(-2.54,0)
  round 3 hole 1.7: 2(2.54,0)
  silkscreen extent -5.88,-2 5.88,10, body extent -5.83,-1.98 5.93,10.02, height 8.5
TBP01R1-508-04BE [mm]
  rect 3x3 hole 1.7: 1(-5.08,0)
  round 3 hole 1.7: 2(0,0) 3(5.08,0) 4(10.16,0)
  silkscreen extent -8.42,-2 13.5,10, body extent -8.46,-1.99 13.46,10.01, height 8.5
"TEST POINT" [mil]
  oct 60x60 smd: 1(0,0)
  silkscreen extent -37,-37 37,37
TS-1185EC-C-D-B [mm]
  rect 1.25x0.9 smd: 1(-1.925,0.75) 1(1.925,0.75) 2(-1.925,-0.75) 2(1.925,-0.75)
  silkscreen extent -2.39,-1.52 1.73,1.68, body extent -2.33,-1.5 2.32,1.5, height 2
TSOT-23-8 [mm]
  rect 1.05x0.45 smd: 1(-1.3,0.975) 2(-1.3,0.325) 3(-1.3,-0.325) 4(-1.3,-0.975) 5(1.3,-0.975) 6(1.3,-0.325) 7(1.3,0.325) 8(1.3,0.975)
  silkscreen extent -1.39,-1.5 0.58,1.52, body extent -1.4,-1.45 1.4,1.45, height 1
U.FL-R-SMT-1(80)_ [mm]
  rect 1.02x1.07 smd: 1(0,-0.974)
  rect 1.07x2.2 smd: 2(1.475,0.974) 3(-1.475,0.974)
  silkscreen extent -1.22,-1.09 1.22,2.21, body extent -1.47,-0.74 1.53,2.36, height 1.2
UCD1H221MNL1GS [mm] "CAP ALUM 220UF 20% 50V SMD"
  rect 4x2.5 smd: 1(-4,0) 2(4,0)
  silkscreen extent -5.18,-4.24 4.29,4.29, body extent -4.67,-4.23 4.62,4.28, height 10.34
VG039NCHXTB222 [mm]
  rect 1.2x1.2 smd: 1(-1,-1.625) 2(1,-1.625) 3(0,1.625)
  silkscreen extent -1.55,-2.62 1.55,1.93, body extent -1.5,-1.92 1.5,1.88, height 1.1
VT1H471MI135000CE0 [mm] "470uF ±20% 50V 12.5mm 13.5mm 1000hrs 105? -40?~+105? SMD,12.5x13.5mm Aluminum Electrolytic Capacitors - SMD RoHS"
  rect 6.2x1.75 smd: 1(-5.145,0) 2(5.145,0)
  silkscreen extent -8.62,-6.81 8.74,6.86, body extent -7.5,-6.85 7.5,6.85, height 14
WSON-6 [mm]
  rect 0.6x0.25 smd: 1(-1.15,0.65) 2(-1.15,0) 3(-1.15,-0.65) 4(1.15,-0.65) 5(1.15,0) 6(1.15,0.65)
  rect 0.75x1.2 smd: 7(0,0)
  silkscreen extent -1.74,-1.14 1.17,1.14, body extent -1.25,-1.1 1.25,1.1, height 0.8
X322512MOB4SI [mm]
  rect 1.4x1.2 smd: 1(-1.1,-0.85) 2(1.1,-0.85) 3(1.1,0.85) 4(-1.1,0.85)
  silkscreen extent -2.16,-1.3 1.65,1.3, body extent -1.6,-1.24 1.6,1.24, height 0.99
YS-SBZ9032C03R16 [mm] "NO 2700Hz 85dB @ 3V, 10cm 3V F9mm SMD,9x3.2mm Buzzers RoHS"
  rect 3x1.8 smd: 1(-4,0) 2(4,0)
  silkscreen extent -5.46,-4.5 6.06,6.54, body extent -5.25,-4.5 5.25,6.5, height 3.3

## Part data
c C11 C16 C30: library part RVT1E100M0405, "CAP ALUM 10uF 25V SMD", Manufacturer=ROQANG, Operating Temperature=-45℃~+105℃, Rated Voltage=25V, Tolerance=±20%, Capacitance=10uF, L=5.4mm, φD=4mm
C1 C39: library part UCD1H221MNL1GS, "CAP ALUM 220UF 20% 50V SMD", Case/Package=Radial, Leakage Current=3uA, Manufacturer=Nichicon, Max Operating Temperature=105°C, Min Operating Temperature=-55°C, Package Quantity=1, Ripple Current=700mA, Supplier Part Number 1=493-6390-1-ND, Tolerance=20%, Voltage=50V, Capacitance=220uF, Category="Aluminum Electrolytic Capacitors", ComponentLink1Description=https://datasheet.ciiva.com/11776/0900766b80ebdadd-11776792.pdf?src-supplier=RSComponents, ComponentLink1URL=https://datasheet.ciiva.com/11776/0900766b80ebdadd-11776792.pdf?src-supplier=RSComponents, ComponentLink2Description=https://datasheet.ciiva.com/5362/e-cd-22158-5362489.pdf?src-supplier=Mouser, ComponentLink2URL=https://datasheet.ciiva.com/5362/e-cd-22158-5362489.pdf?src-supplier=Mouser, ComponentLink3Description=https://datasheet.ciiva.com/11684/e-cd-11684678.pdf?src-supplier=Avnet, ComponentLink3URL=https://datasheet.ciiva.com/11684/e-cd-11684678.pdf?src-supplier=Avnet, ComponentLink4Description=https://datasheet.ciiva.com/15037/e-cd-15037119.pdf?src-supplier=Digi-Key, ComponentLink4URL=https://datasheet.ciiva.com/15037/e-cd-15037119.pdf?src-supplier=Digi-Key, ComponentLink5Description=https://datasheet.ciiva.com/16393/e-cd-16393493.pdf?src-supplier=Future+Electronics, ComponentLink5URL=https://datasheet.ciiva.com/16393/e-cd-16393493.pdf?src-supplier=Future+Electronics, ComponentLink6Description=https://datasheet.ciiva.com/17354/e-cd-17354606.pdf?src-supplier=Avnet+Europe, ComponentLink6URL=https://datasheet.ciiva.com/17354/e-cd-17354606.pdf?src-supplier=Avnet+Europe, Construction=Cylindrical, Diameter=10mm, Dissipation Factor=0.1%, Features="General Purpose", Height=10mm, Height - Seated (Max)=0.394inch, Impedance=160mR, Lead Free="Lead Free", Length=10mm, Life (Hours)=5000Hour, Manufacturer Part Number=UCD1H221MNL1GS, Mount="Surface Mount,PCB", Packaging="Tape and Reel", Pricing 1="1=0.85000, 10=0.60200, 50=0.45480, 100=0.39620 (USD)", Radiation Hardening=No, RoHS=Yes, RoHS Compliant=Yes, Series=CD, Supplier 1=Digi-Key, Termination=SMD/SMT, Voltage Rating=50V, Voltage Rating (DC)=50V
C2 C33 C34: library part VT1H471MI135000CE0, "470uF ±20% 50V 12.5mm 13.5mm 1000hrs 105℃ -40℃~+105℃ SMD,12.5x13.5mm Aluminum Electrolytic Capacitors - SMD RoHS", Lifetime @ Temp="1000hrs 105℃", Manufacturer="Changzhou Huawei Elec", Operating Temperature=-40℃~+105℃, Package=SMD,12.5x13.5mm, Rated Voltage=50V, Tolerance=±20%, Capacitance=470uF, L=13.5mm, φD=12.5mm
C3 C4 C7 C8 C13 C18 C20 C23 C24 C32 C36 C37 C38 C41 C42 C45: library part CC0603KRX7R0BB104, "CAP CER 0.1UF 100V X7R 0603", Capacitance=100nF, Case Code (Imperial)=0603, Case Code (Metric)=1608, Dielectric=X7R, Manufacturer=Yageo, Max Operating Temperature=125°C, Min Operating Temperature=-55°C, Package Quantity=4000, Resistor Type=Ceramic, Supplier Part Number 1=311-1523-1-ND, Tolerance=10%, Voltage Rating=100V, Case/Package=0603, Category="Ceramic Capacitors", ComponentLink1Description=https://datasheet.ciiva.com/6277/mlccorderingcode-6277030.pdf?src-supplier=Digi-Key, ComponentLink1URL=https://datasheet.ciiva.com/6277/mlccorderingcode-6277030.pdf?src-supplier=Digi-Key, ComponentLink2Description=https://datasheet.ciiva.com/6277/mlccorderingcode-6277081.pdf?src-supplier=Digi-Key, ComponentLink2URL=https://datasheet.ciiva.com/6277/mlccorderingcode-6277081.pdf?src-supplier=Digi-Key, ComponentLink3Description=https://datasheet.ciiva.com/6277/mlccorderingcode-6277082.pdf?src-supplier=Digi-Key, ComponentLink3URL=https://datasheet.ciiva.com/6277/mlccorderingcode-6277082.pdf?src-supplier=Digi-Key, Depth=0.8mm, Lead Free="Lead Free", Length=0.063inch, Manufacturer Part Number=CC0603KRX7R0BB104, Mount="Surface Mount", Packaging="Tape and Reel", Pricing 1="1=0.19000, 10=0.13500, 50=0.07680, 100=0.06370, 500=0.04466, 1000=0.03696 (USD)", RoHS=Yes, RoHS Compliant=Yes, Series=CC, Stock 1=60476, Supplier 1=Digi-Key, Termination=SMD/SMT, Thickness=0.035inch, Voltage Rating (DC)=100V, Weight=7.1E-05oz, Width=0.031inch
C5: library part TAJE107M025RNJ, "CAP TANT 100UF 20% 25V 2917", Case Code (Imperial)=2917, Case Code (Metric)=7343, ESR (Equivalent Series Resistance)=300mR, Leakage Current=25uA, Manufacturer="Kyocera AVX", Max Operating Temperature=125°C, Min Operating Temperature=-55°C, Package Quantity=1, Supplier Part Number 1=581-TAJE107M025RNJ, Tolerance=20%, Voltage Rating=25V, Capacitance=100uF, Case/Package=2917, Category="Tantalum Capacitors", ComponentLink1Description=https://datasheet.ciiva.com/26787/taje107m025rnj-26787048.pdf?src-supplier=IIIC, ComponentLink1URL=https://datasheet.ciiva.com/26787/taje107m025rnj-26787048.pdf?src-supplier=IIIC, ComponentLink2Description=https://datasheet.ciiva.com/265/taj-265541.pdf?src-supplier=Digi-Key, ComponentLink2URL=https://datasheet.ciiva.com/265/taj-265541.pdf?src-supplier=Digi-Key, ComponentLink3Description=https://datasheet.ciiva.com/265/taj-265542.pdf?src-supplier=Digi-Key, ComponentLink3URL=https://datasheet.ciiva.com/265/taj-265542.pdf?src-supplier=Digi-Key, ComponentLink4Description=https://datasheet.ciiva.com/265/taj-265540.pdf?src-supplier=Digi-Key, ComponentLink4URL=https://datasheet.ciiva.com/265/taj-265540.pdf?src-supplier=Digi-Key, ComponentLink5Description=https://datasheet.ciiva.com/28609/1719052-28609254.pdf?src-supplier=Element14, ComponentLink5URL=https://datasheet.ciiva.com/28609/1719052-28609254.pdf?src-supplier=Element14, ComponentLink6Description=https://datasheet.ciiva.com/11230/taj-11230456.pdf?src-supplier=Avnet, ComponentLink6URL=https://datasheet.ciiva.com/11230/taj-11230456.pdf?src-supplier=Avnet, ComponentLink7Description=https://datasheet.ciiva.com/17339/taj-17339677.pdf?src-supplier=Avnet+Europe, ComponentLink7URL=https://datasheet.ciiva.com/17339/taj-17339677.pdf?src-supplier=Avnet+Europe, ComponentLink8Description=https://datasheet.ciiva.com/22667/1719052-22667581.pdf?src-supplier=Element14, ComponentLink8URL=https://datasheet.ciiva.com/22667/1719052-22667581.pdf?src-supplier=Element14, Construction=Flat, Depth=4.3mm, Dissipation Factor=10%, Features="General Purpose", Height=4.3mm, Height - Seated (Max)=0.169inch, Lead Free="Lead Free", Length=7.3mm, Manufacturer Part Number=TAJE107M025RNJ, Mount="Surface Mount", Number of Pins=2, Packaging="Tape and Reel", Polarity=Polar, Pricing 1="1=2.81000, 10=2.81000, 50=2.81000, 100=2.19000, 1000=1.76000, 10000=1.76000 (USD)", Radiation Hardening=No, REACH SVHC="No SVHC", RoHS=Yes, RoHS Compliant=Yes, Series=TAJ, Stock 1=109, Supplier 1=Mouser, Termination=SMD/SMT, Voltage Rating (DC)=25V, Width=4.3mm
C9 C10: library part CC0603JRNPO9BN180, "CAP CER 18pF 5% C0G 50V 0603 Paper T/R", Case Code (Imperial)=0603, Case Code (Metric)=1608, Dielectric=C0G, Insulation Resistance=100GR, Manufacturer=Yageo, Max Operating Temperature=125°C, Min Operating Temperature=-55°C, Package Quantity=1, Resistor Type=Ceramic, Temperature Coefficient=30ppm/°C, Tolerance=5%, Voltage Rating=50V, Capacitance=18pF, Case/Package=0603, Category="Ceramic Capacitors", ComponentLink1Description=https://datasheet.ciiva.com/144/mlccorderingcode-144638.pdf?src-supplier=Digi-Key, ComponentLink1URL=https://datasheet.ciiva.com/144/mlccorderingcode-144638.pdf?src-supplier=Digi-Key, ComponentLink2Description=https://datasheet.ciiva.com/144/mlccorderingcode-144637.pdf?src-supplier=Digi-Key, ComponentLink2URL=https://datasheet.ciiva.com/144/mlccorderingcode-144637.pdf?src-supplier=Digi-Key, ComponentLink3Description=https://datasheet.ciiva.com/144/mlccorderingcode-144639.pdf?src-supplier=Digi-Key, ComponentLink3URL=https://datasheet.ciiva.com/144/mlccorderingcode-144639.pdf?src-supplier=Digi-Key, ComponentLink4Description=https://datasheet.ciiva.com/28450/1443161-28450477.pdf?src-supplier=Element14, ComponentLink4URL=https://datasheet.ciiva.com/28450/1443161-28450477.pdf?src-supplier=Element14, ComponentLink5Description=https://datasheet.ciiva.com/46430/1835847-46430152.pdf?src-supplier=Element14, ComponentLink5URL=https://datasheet.ciiva.com/46430/1835847-46430152.pdf?src-supplier=Element14, ComponentLink6Description=https://datasheet.ciiva.com/5425/upy-gp-np0-16v-to-50v-8-5425439.pdf?src-supplier=Mouser, ComponentLink6URL=https://datasheet.ciiva.com/5425/upy-gp-np0-16v-to-50v-8-5425439.pdf?src-supplier=Mouser, ComponentLink7Description=https://datasheet.ciiva.com/8033/1734582-8033733.pdf?src-supplier=Element14, ComponentLink7URL=https://datasheet.ciiva.com/8033/1734582-8033733.pdf?src-supplier=Element14, ComponentLink8Description=https://datasheet.ciiva.com/11587/upy-gp-np0-16v-to-50v-8-11587323.pdf?src-supplier=Avnet, ComponentLink8URL=https://datasheet.ciiva.com/11587/upy-gp-np0-16v-to-50v-8-11587323.pdf?src-supplier=Avnet, Depth=0.8mm, Height=0.8mm, Lead Free="Lead Free", Length=1.6mm, Manufacturer Part Number=CC0603JRNPO9BN180, Mount="Surface Mount", Number of Pins=2, Packaging="Tape and Reel", Pricing 1="4000=0.00960, 8000=0.00660, 12000=0.00650, 28000=0.00640, 100000=0.00540 (USD)", Radiation Hardening=No, REACH SVHC="No SVHC", RoHS=Yes, RoHS Compliant=Yes, Series=CC, Stock 1=4000, Supplier 1="Arrow Electronics", Supplier Part Number 1=CC0603JRNPO9BN180, Termination=SMD/SMT, Thickness=0.035inch, Voltage Rating (DC)=50V, Width=0.031inch
C12 C14 C15 C17 C26 C27 C28 C29 C31 C35: library part CL10A105KA8NNNC, "CAP CER 1UF 25V X5R 0603", Case/Package=0603, Dielectric=X5R, Manufacturer=Sams, Max Operating Temperature=85°C, Min Operating Temperature=-55°C, Supplier Part Number 1=1276-1102-1-ND, Tolerance=10%, Voltage=25V, Capacitance=1uF, Depth=0.8mm, Height=0.8mm, Lead Free="Lead Free", Length=1.6mm, Manufacturer Part Number=CL10A105KA8NNNC, Mount="Surface Mount", Pricing 1="1=0.1, 10=0.036, 50=0.0198, 100=0.0161, 500=0.01152, 1000=0.00904 (USD)", Stock 1=2768758, Supplier 1=Digi-Key, Voltage Rating (DC)=25V
C19 C22: library part CL10A106MA8NRNC, "CAP CER 10UF 25V X5R 0603", Case Code (Imperial)=0603, Case Code (Metric)=1608, Dielectric=X5R, Manufacturer=Samsung, Max Operating Temperature=85°C, Min Operating Temperature=-55°C, Package Quantity=1, Tolerance=20%, Voltage Rating=25V, Capacitance=10uF, Case/Package=0603, Category="Ceramic Capacitors", ComponentLink1Description=https://datasheet.ciiva.com/25766/cl10a106ma8nrnc-25766562.pdf?src-supplier=Digi-Key, ComponentLink1URL=https://datasheet.ciiva.com/25766/cl10a106ma8nrnc-25766562.pdf?src-supplier=Digi-Key, Construction=Flat, Contact Plating=Tin, Lead Free="Lead Free", Length=0.063inch, Manufacturer Part Number=CL10A106MA8NRNC, Mount="Surface Mount", Packaging="Tape and Reel", Pricing 1="4000=0.03753, 8000=0.03700, 16000=0.03595, 24000=0.03515, 32000=0.03383, 40000=0.03304, 400000=0.03225 (USD)", RoHS=Yes, RoHS Compliant=Yes, Series=CL, Supplier 1=Avnet, Supplier Part Number 1=CL10A106MA8NRNC, Termination=Wraparound, Thickness=0.035inch, Width=0.031inch
C21: library part CL10B102KC8NNNC, "CAP CER 1nF 100V X7R 0603", Case Code (Imperial)=0603, Case Code (Metric)=1608, Dielectric=X7R, Manufacturer=Samsung, Max Operating Temperature=125°C, Min Operating Temperature=-55°C, Package Quantity=1, Tolerance=10%, Voltage=100V, Capacitance=1nF, Case/Package=0603, Category="Ceramic Capacitors", ComponentLink1Description=https://datasheet.ciiva.com/25799/cl10b102kc8nnnc-25799476.pdf?src-supplier=Digi-Key, ComponentLink1URL=https://datasheet.ciiva.com/25799/cl10b102kc8nnnc-25799476.pdf?src-supplier=Digi-Key, ComponentLink2Description=https://datasheet.ciiva.com/29198/458286-da-01-en-vs-kondensator-0603-29198496.pdf?src-supplier=Conrad, ComponentLink2URL=https://datasheet.ciiva.com/29198/458286-da-01-en-vs-kondensator-0603-29198496.pdf?src-supplier=Conrad, ComponentLink3Description=https://datasheet.ciiva.com/26838/getdatasheetpartid-640779-26838395.pdf?src-supplier=Verical, ComponentLink3URL=https://datasheet.ciiva.com/26838/getdatasheetpartid-640779-26838395.pdf?src-supplier=Verical, ComponentLink4Description=https://datasheet.ciiva.com/26310/mlcc-catalogdownload2013-eng-26310266.pdf?src-supplier=Distrelec, ComponentLink4URL=https://datasheet.ciiva.com/26310/mlcc-catalogdownload2013-eng-26310266.pdf?src-supplier=Distrelec, ComponentLink5Description=https://datasheet.ciiva.com/16199/cl05b104kq5nnnc-16199246.pdf?src-supplier=Future+Electronics, ComponentLink5URL=https://datasheet.ciiva.com/16199/cl05b104kq5nnnc-16199246.pdf?src-supplier=Future+Electronics, Construction=Flat, Contact Plating=Tin, Depth=0.8mm, Height=0.8mm, Lead Free="Lead Free", Length=1.6mm, Manufacturer Part Number=CL10B102KC8NNNC, Material=Ceramic, Mount="Surface Mount", Packaging="Tape and Reel", Pricing 1="4000=0.00988, 8000=0.00987, 16000=0.00986, 24000=0.00985, 32000=0.00984, 40000=0.00982, 400000=0.00981 (USD)", Radiation Hardening=No, RoHS=Yes, RoHS Compliant=Yes, Series=CL, Stock 1=184000, Supplier 1=Avnet, Supplier Part Number 1=CL10B102KC8NNNC, Thickness=0.035inch, Voltage Rating=100V, Voltage Rating (DC)=100V, Width=0.031inch
C25 C40: library part UMK107B7474KA-TR, "CAP CER 0.47uF 50V X7R 0603", Capacitance=470nF, Case Code (Imperial)=0603, Case Code (Metric)=1608, Dielectric=X7R, Manufacturer="Taiyo Yuden", Max Operating Temperature=125°C, Min Operating Temperature=-55°C, Package Quantity=1, Supplier Part Number 1=587-3170-1-ND, Tolerance=10%, Voltage=50V, Case/Package=0603, Category="Ceramic Capacitors", ComponentLink1Description=https://datasheet.ciiva.com/30063/972umk107b7474ka-tr-30063804.pdf?src-supplier=Onlinecomponents.com, ComponentLink1URL=https://datasheet.ciiva.com/30063/972umk107b7474ka-tr-30063804.pdf?src-supplier=Onlinecomponents.com, ComponentLink2Description=https://datasheet.ciiva.com/11600/umk107b7474ka-tr-ss-11600367.pdf?src-supplier=Avnet, ComponentLink2URL=https://datasheet.ciiva.com/11600/umk107b7474ka-tr-ss-11600367.pdf?src-supplier=Avnet, ComponentLink3Description=https://datasheet.ciiva.com/15922/257umk107b7474ka-tr-15922607.pdf?src-supplier=Onlinecomponents.com, ComponentLink3URL=https://datasheet.ciiva.com/15922/257umk107b7474ka-tr-15922607.pdf?src-supplier=Onlinecomponents.com, ComponentLink4Description=https://datasheet.ciiva.com/6274/mlcc-all-e-6274710.pdf?src-supplier=Digi-Key, ComponentLink4URL=https://datasheet.ciiva.com/6274/mlcc-all-e-6274710.pdf?src-supplier=Digi-Key, ComponentLink5Description=https://datasheet.ciiva.com/5412/mlcc01-e-5412119.pdf?src-supplier=Mouser, ComponentLink5URL=https://datasheet.ciiva.com/5412/mlcc01-e-5412119.pdf?src-supplier=Mouser, ComponentLink6Description=https://datasheet.ciiva.com/6274/mlcc-all-e-6274712.pdf?src-supplier=Digi-Key, ComponentLink6URL=https://datasheet.ciiva.com/6274/mlcc-all-e-6274712.pdf?src-supplier=Digi-Key, ComponentLink7Description=https://datasheet.ciiva.com/6274/mlcc-all-e-6274713.pdf?src-supplier=Digi-Key, ComponentLink7URL=https://datasheet.ciiva.com/6274/mlcc-all-e-6274713.pdf?src-supplier=Digi-Key, Construction=Flat, Depth=0.8mm, Halogen Free="Halogen Free", Height=0.8mm, Lead Free="Lead Free", Length=1.6mm, Manufacturer Part Number=UMK107B7474KA-TR, Mount="Surface Mount", Packaging="Tape and Reel", Pricing 1="1=0.21000, 10=0.14800, 50=0.08400, 100=0.06950, 500=0.04876, 1000=0.04036 (USD)", Radiation Hardening=No, RoHS=Yes, RoHS Compliant=Yes, Series=M, Stock 1=81, Supplier 1=Digi-Key, Termination=SMD/SMT, Thickness=0.035inch, Voltage Rating=50V, Voltage Rating (DC)=50V, Width=0.031inch
C43 C44: library part CC0603JRNPO9BN200, "CAP CER 20PF 50V C0G/NPO 0603", Case Code (Imperial)=0603, Case Code (Metric)=1608, Dielectric=C0G, LCSC Part Number=C105621, Manufacturer=Yageo, Max Operating Temperature=125°C, Min Operating Temperature=-55°C, Package Quantity=4000, Supplier Part Number 1=311-1424-6-ND, Tolerance=5%, Voltage Rating=50V, Capacitance=20pF, Case/Package=0603, ComponentLink1Description=http://www.farnell.com/datasheets/1132289.pdf?src-supplier=Element14, ComponentLink1URL=http://www.farnell.com/datasheets/1132289.pdf?src-supplier=Element14, ComponentLink2Description=http://www.yageo.com/documents/recent/UPY-GP_NP0_16V-to-50V_16.pdf?src-supplier=Digi-Key, ComponentLink2URL=http://www.yageo.com/documents/recent/UPY-GP_NP0_16V-to-50V_16.pdf?src-supplier=Digi-Key, Composition=Ceramic, Depth=0.8mm, Lead Free="Lead Free", Length=1.6mm, Manufacturer Part Number=CC0603JRNPO9BN200, Mount="Surface Mount", Number of Pins=2, Packaging="Tape and Reel", Pricing 1="1=0.1, 10=0.048, 100=0.0214, 500=0.01526, 1000=0.01198 (USD)", REACH SVHC=Unknown, Stock 1=259568, Supplier 1=Digi-Key, Termination=SMD/SMT, Thickness=0.035inch, Voltage Rating (DC)=50V, Weight=7.1E-05oz, Width=0.8mm
C46: library part CC0603CRNPO9BN1R2, "CAP CER 1.2PF 50V C0G/NPO 0603", Case Code (Imperial)=0603, Case Code (Metric)=1608, Dielectric=C0G, Insulation Resistance=10GR, Manufacturer=Yageo, Max Operating Temperature=125°C, Min Operating Temperature=-55°C, Package Quantity=4000, Resistor Type=Ceramic, Voltage Rating=50V, Capacitance=1.2pF, Case/Package=0603, Category="Ceramic Capacitors", ComponentLink1Description=https://datasheet.ciiva.com/26862/getdatasheetpartid-403496-26862685.pdf?src-supplier=Verical, ComponentLink1URL=https://datasheet.ciiva.com/26862/getdatasheetpartid-403496-26862685.pdf?src-supplier=Verical, ComponentLink2Description=https://datasheet.ciiva.com/13209/upy-gp-np0-16v-to-50v-8-13209833.pdf?src-supplier=Mouser, ComponentLink2URL=https://datasheet.ciiva.com/13209/upy-gp-np0-16v-to-50v-8-13209833.pdf?src-supplier=Mouser, ComponentLink3Description=https://datasheet.ciiva.com/8033/1443161-8033679.pdf?src-supplier=Element14, ComponentLink3URL=https://datasheet.ciiva.com/8033/1443161-8033679.pdf?src-supplier=Element14, ComponentLink4Description=https://datasheet.ciiva.com/8033/1443161-8033677.pdf?src-supplier=Element14, ComponentLink4URL=https://datasheet.ciiva.com/8033/1443161-8033677.pdf?src-supplier=Element14, ComponentLink5Description=https://datasheet.ciiva.com/11586/upy-gp-np0-16v-to-50v-8-11586438.pdf?src-supplier=Avnet, ComponentLink5URL=https://datasheet.ciiva.com/11586/upy-gp-np0-16v-to-50v-8-11586438.pdf?src-supplier=Avnet, Depth=0.8mm, Height=0.8mm, Lead Free="Lead Free", Length=1.6mm, Manufacturer Part Number=CC0603CRNPO9BN1R2, Mount="Surface Mount", Packaging="Tape and Reel", Pricing 1="4000=0.00980, 8000=0.00850, 12000=0.00840, 40000=0.00420 (USD)", Radiation Hardening=No, REACH SVHC="No SVHC", RoHS=Yes, RoHS Compliant=Yes, Series=CC, Stock 1=8000, Supplier 1="Arrow Electronics", Supplier Part Number 1=CC0603CRNPO9BN1R2, Termination=SMD/SMT, Thickness=0.035inch, Voltage Rating (DC)=50V, Weight=7.1E-05oz, Width=0.031inch
C47: library part UMK107BBJ225MA-T, "CAP CER 2.2UF 50V X5R 0603", Manufacturer="Taiyo Yuden", Supplier Part Number 1=587-6298-1-ND, Category="Ceramic Capacitors", Manufacturer Part Number=UMK107BBJ225MA-T, Pricing 1="1=0.26000, 10=0.18100, 50=0.12060, 100=0.10240, 500=0.07232, 1000=0.06327 (USD)", RoHS=Yes, RoHS Compliant=Yes, Stock 1=1, Supplier 1=Digi-Key
C48: library part CC0603CRNPO9BN1R5, "CAP CER 1.5PF 50V C0G/NPO 0603", Case Code (Imperial)=0603, Case Code (Metric)=1608, Dielectric=C0G, Insulation Resistance=10GR, Manufacturer=Yageo, Max Operating Temperature=125°C, Min Operating Temperature=-55°C, Package Quantity=1, Supplier Part Number 1=311-1050-6-ND, Temperature Coefficient=30ppm/°C, Voltage=50V, Capacitance=1.5pF, Case/Package=0603, ComponentLink1Description=http://www.yageo.com/documents/recent/UPY-GP_NP0_16V-to-50V_16.pdf?src-supplier=Digi-Key, ComponentLink1URL=http://www.yageo.com/documents/recent/UPY-GP_NP0_16V-to-50V_16.pdf?src-supplier=Digi-Key, ComponentLink2Description=http://www.yageo.com/exep/pages/download/literatures/ProductSelectionGuide%202014_Final_2.pdf?src-supplier=Digi-Key, ComponentLink2URL=http://www.yageo.com/exep/pages/download/literatures/ProductSelectionGuide%202014_Final_2.pdf?src-supplier=Digi-Key, ComponentLink3Description=http://www.mouser.com/ds/2/447/Yageo_UPY-GP_NP0_16V-to-50V_9-358835.pdf?src-supplier=Mouser, ComponentLink3URL=http://www.mouser.com/ds/2/447/Yageo_UPY-GP_NP0_16V-to-50V_9-358835.pdf?src-supplier=Mouser, ComponentLink4Description=http://www.yageo.com/documents/recent/UPY-GP_NP0_16V-to-50V_8.pdf?src-supplier=Avnet, ComponentLink4URL=http://www.yageo.com/documents/recent/UPY-GP_NP0_16V-to-50V_8.pdf?src-supplier=Avnet, ComponentLink5Description=http://www.yageo.com/documents/recent/UPY-GP_NP0_16V-to-50V_8.pdf?src-supplier=Avnet+Europe, ComponentLink5URL=http://www.yageo.com/documents/recent/UPY-GP_NP0_16V-to-50V_8.pdf?src-supplier=Avnet+Europe, ComponentLink6Description=https://www.verical.com/server-webapp/html/getDatasheet?partID=38063&src-supplier=Verical, ComponentLink6URL=https://www.verical.com/server-webapp/html/getDatasheet?partID=38063&src-supplier=Verical, Composition=Ceramic, Depth=0.8mm, Height=0.8mm, Lead Free="Lead Free", Length=1.6mm, Manufacturer Part Number=CC0603CRNPO9BN1R5, Mount="Surface Mount", Packaging="Tape and Reel", Pricing 1="1=0.1, 10=0.058, 100=0.0259, 500=0.01852, 1000=0.01455 (USD)", Radiation Hardening=No, REACH SVHC=Unknown, Stock 1=34794, Supplier 1=Digi-Key, Termination=SMD/SMT, Thickness=0.035inch, Voltage Rating=50V, Voltage Rating (DC)=50V, Weight=7.1E-05oz, Width=0.031inch
C49: library part GRM188R6YA225KA12D, "CAP, 2.2µF, 35V, 10%, X5R, 0603", Case Code (Imperial)=0603, Case Code (Metric)=1608, Dielectric=X5R, LCSC Part Number=C86017, Manufacturer=Murata, Max Operating Temperature=85°C, Min Operating Temperature=-55°C, Package Quantity=4000, Supplier Part Number 1=490-7204-1-ND, Tolerance=10%, Voltage=35V, Capacitance=2.2uF, Case/Package=0603, Category="Ceramic Capacitors", ComponentLink1Description=https://datasheet.ciiva.com/14906/partnumbering-e-01-14906490.pdf?src-supplier=Digi-Key, ComponentLink1URL=https://datasheet.ciiva.com/14906/partnumbering-e-01-14906490.pdf?src-supplier=Digi-Key, ComponentLink2Description=https://datasheet.ciiva.com/14906/partnumbering-e-01-14906491.pdf?src-supplier=Digi-Key, ComponentLink2URL=https://datasheet.ciiva.com/14906/partnumbering-e-01-14906491.pdf?src-supplier=Digi-Key, ComponentLink3Description=https://datasheet.ciiva.com/14906/partnumbering-e-01-14906492.pdf?src-supplier=Digi-Key, ComponentLink3URL=https://datasheet.ciiva.com/14906/partnumbering-e-01-14906492.pdf?src-supplier=Digi-Key, Depth=0.8mm, Height=0.8mm, Lead Free="Lead Free", Length=1.6mm, Manufacturer Part Number=GRM188R6YA225KA12D, Material=Ceramic, Mount="Surface Mount", Packaging="Tape and Reel", Pricing 1="1=0.21000, 10=0.14100, 50=0.08480, 100=0.07170, 500=0.04904, 1000=0.04338 (USD)", REACH SVHC="No SVHC", RoHS=Yes, RoHS Compliant=Yes, Series=GRM, Stock 1=81665, Supplier 1=Digi-Key, Termination=SMD/SMT, Thickness=0.035inch, Voltage Rating=35V, Voltage Rating (DC)=35V, Weight=0.000222oz, Width=0.8mm
D1: "300μA@100V 100V Single 5A 850mV@5A SMB Schottky Barrier Diodes (SBD) ROHS", Manufacturer=YFW, ComponentLink1Description=LCSC, ComponentLink1URL=https://lcsc.com/product-detail/Schottky-Barrier-Diodes-SBD_YFW-SS510_C2898359.html, Manufacturer Part Number=SS510
D2 D3 D11: "40V 500mV@1A 1A SMA(DO-214AC) Schottky Barrier Diodes (SBD) ROHS", Average Rectified Current=1A, Case/Package=SMA, Forward Voltage=500mV, Manufacturer="Vishay Semiconductors", Max Forward Surge Current (Ifsm)=40A, Max Operating Temperature=125°C, Max Repetitive Reverse Voltage (Vrrm)=40V, Max Reverse Current=200uA, Min Operating Temperature=-65°C, Package Quantity=1, Category="Rectifier Diodes", Contact Plating=Tin,Matte, Current=1A, Current Rating=1A, Element Configuration=Single, Forward Current=1A, Lead Free="Lead Free", Length=4.6mm, Manufacturer Part Number=SS14-E3/61T, Max Reverse Leakage Current=200uA, Max Reverse Voltage (DC)=40V, Max Surge Current=40A, Mount="Surface Mount", Number of Pins=2, Output Current=1A, Packaging="Tape and Reel", Peak Non-Repetitive Surge Current=40A, Polarity=Standard, Pricing 1="1=0.14040, 10=0.13900, 25=0.11710, 100=0.10990 (USD)", Radiation Hardening=No, REACH SVHC=Unknown, RoHS=Yes, Series=-, Stock 1=100, Supplier 1="Arrow Electronics", Supplier Part Number 1=SS14-E3/61T, Termination=SMD/SMT, Voltage=40V, Voltage Rating (DC)=40V, Width=2.9mm
D4 D6 D7: "43.5A 9.2V 6.4V 5V Bi-Directional SMA(DO-214AC) TVS ROHS", Breakdown Voltage=7V, Case/Package=DO-214AC, Clamping Voltage=9.2V, Leakage Current=1.6mA, Manufacturer=Bourns, Max Operating Temperature=150°C, Max Power Dissipation=400W, Max Surge Current=40A, Min Breakdown Voltage=6.4V, Min Operating Temperature=-55°C, Operating Supply Voltage=5V, Package Quantity=1, Peak Pulse Current=43.5A, Power Line Protection=No, Resistor Type=Zener, Supplier Part Number 1=1742481, Test Current=10mA, Category="TVS Diodes", ComponentLink1Description=https://datasheet.ciiva.com/11336/smaj-11336795.pdf?src-supplier=Avnet, ComponentLink1URL=https://datasheet.ciiva.com/11336/smaj-11336795.pdf?src-supplier=Avnet, ComponentLink2Description=https://datasheet.ciiva.com/3022/smaj-3022286.pdf?src-supplier=Avnet, ComponentLink2URL=https://datasheet.ciiva.com/3022/smaj-3022286.pdf?src-supplier=Avnet, ComponentLink3Description=https://datasheet.ciiva.com/334/smaj-334523.pdf?src-supplier=Digi-Key, ComponentLink3URL=https://datasheet.ciiva.com/334/smaj-334523.pdf?src-supplier=Digi-Key, ComponentLink4Description=https://datasheet.ciiva.com/334/smaj-334524.pdf?src-supplier=Digi-Key, ComponentLink4URL=https://datasheet.ciiva.com/334/smaj-334524.pdf?src-supplier=Digi-Key, ComponentLink5Description=https://datasheet.ciiva.com/334/smaj-334522.pdf?src-supplier=Digi-Key, ComponentLink5URL=https://datasheet.ciiva.com/334/smaj-334522.pdf?src-supplier=Digi-Key, ComponentLink6Description=https://datasheet.ciiva.com/30090/smaj-30090141.pdf?src-supplier=Onlinecomponents.com, ComponentLink6URL=https://datasheet.ciiva.com/30090/smaj-30090141.pdf?src-supplier=Onlinecomponents.com, ComponentLink7Description=https://datasheet.ciiva.com/17413/smaj-17413550.pdf?, ComponentLink7URL=https://datasheet.ciiva.com/17413/smaj-17413550.pdf?, Contact Plating=Tin, Diode Type=ZENER, Direction=Bidirectional, Element Configuration=Single, ESD Protection=Yes, Manufacturer Part Number=SMAJ5.0CA, Max Breakdown Voltage=7V, Max Reverse Leakage Current=1.6mA, Mount="Surface Mount", Number of Bidirectional Channels=1, Number of Channels=1, Number of Elements=1, Number of Pins=2, Packaging="Tape and Reel", Peak Pulse Power=400W, Polarity=Bidirectional, Pricing 1="5000=0.16400, 10000=0.16000, 15000=0.15600 (GBP)", Radiation Hardening=No, REACH SVHC="No SVHC", Reverse Breakdown Voltage=6.4V, Reverse Standoff Voltage=5V, RoHS=Yes, RoHS Compliant=Yes, Series=SMAJ, Stock 1=4825, Supplier 1=RSComponents, Termination=SMD/SMT
D5 D8 D12 D13: "100V -55℃~+150℃@(Tj) 400mW Single 1.25V@150mA 4ns 1μA@75V 200mA SOD-323 Switching Diode ROHS", Manufacturer=YFW, ComponentLink1Description=LCSC, ComponentLink1URL=https://lcsc.com/product-detail/Switching-Diode_YFW-1N4148WS_C1884546.html, Manufacturer Part Number=1N4148WS